# Altium PCB EMG-Arm-ELEC-V1.0.PcbDoc (part 4 of 5)
Units mil, origin at the board's own origin, x right, y up, seen from the top; angles counter-clockwise.
Board outline 8303.83 x 7532.25 mil, 2 copper layers (Top Layer, Bottom Layer), stack 3.556 mil thick; 303 components, 183 nets, 804 pads, 233 vias.
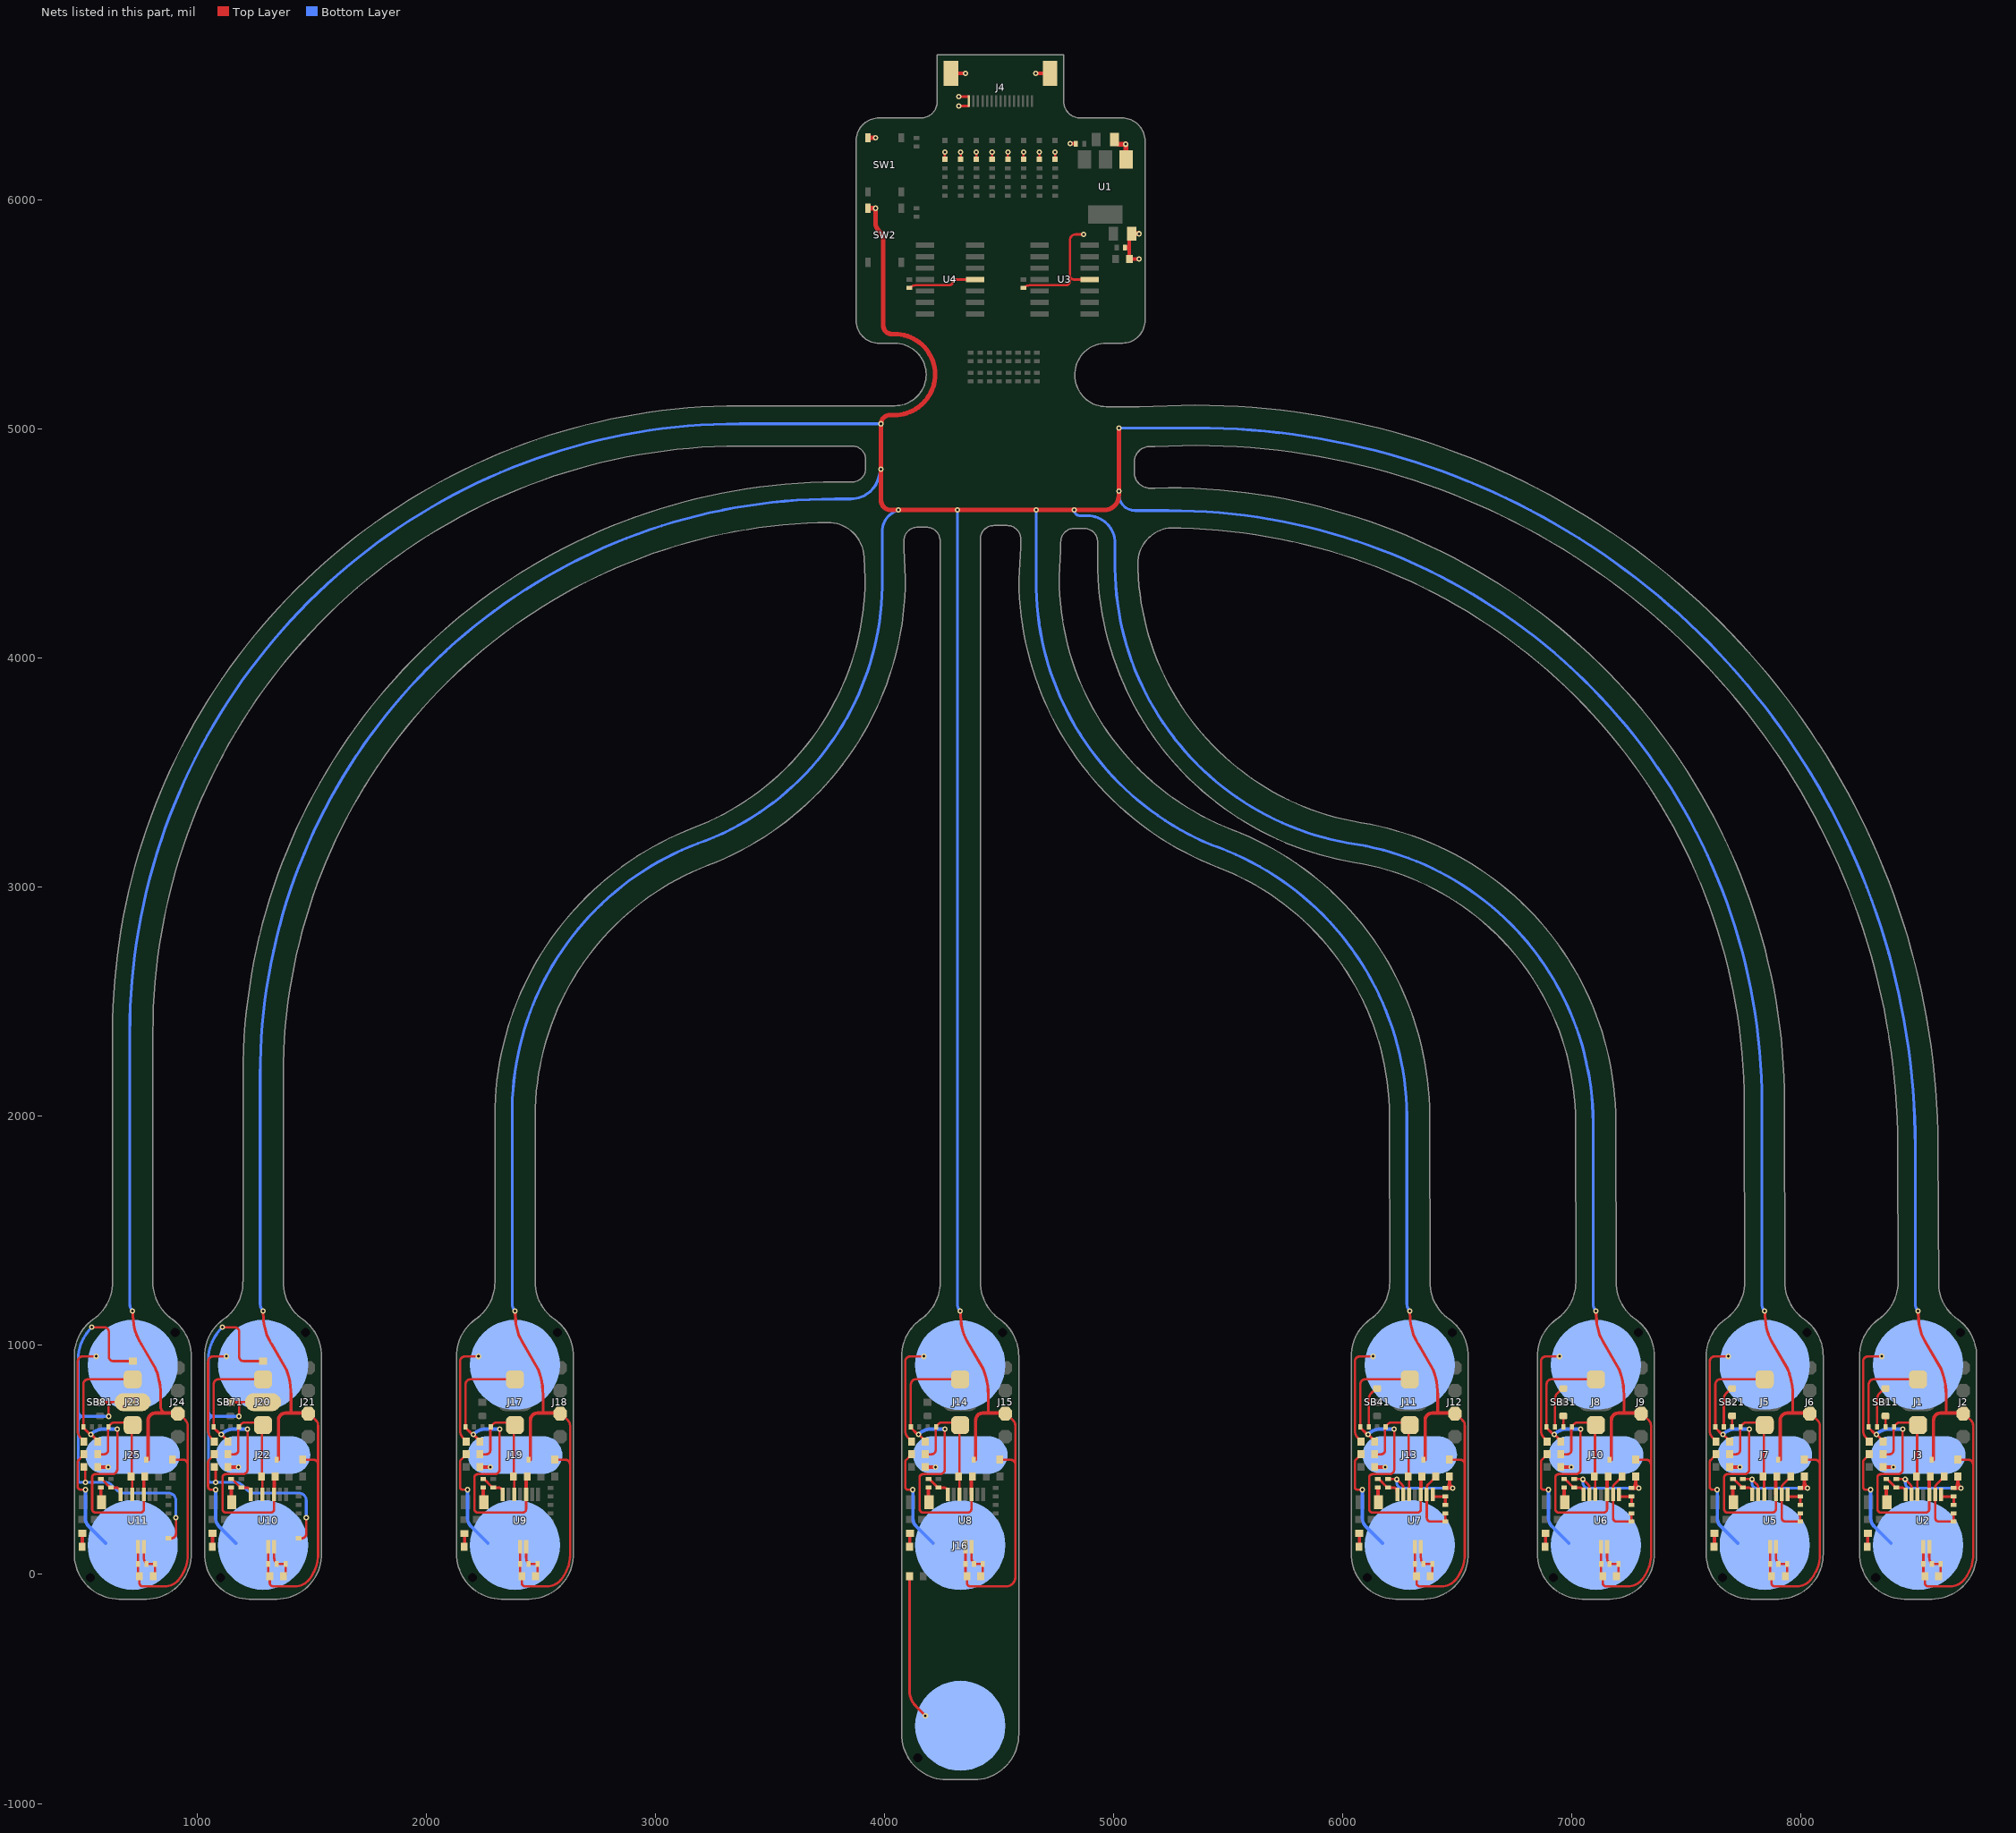
[diagram p3: the nets of this part, all layers, seen from the top]

## Via types
v1: diameter 23.62, hole 11.81, Top Layer to Bottom Layer, tented both sides, 233 vias

## Nets (pads, with @x,y where several pads share a name; then routed paths per layer and width w, separated by ;. In a path a pad name is that pad's centre, name@x,y a point inside that pad or via, vN(x,y) a via of type N, cw(c..) or ccw(c..) an arc to the next point about the centre after c; other vN are vias at no path point) (continued)
DRL_7: J20.2 R100.2 R120.1 SB71.2 SB73.2 | length 2170.6
  Top Layer w10: v1(1081.63,401.46) SB73.2@1081.63,467.64 ; v1(1110.38,1079.6) 1164.03,1079.6 cw(c1164.03,1059) 1184.63,1059 1184.63,950 ccw(c1203.1,950) 1203.1,931.53 R120.1@1288.59,931.53 ; SB71.2@1146.15,751.97 1183.15,751.97 ; 1168.79,751.97 cw(c1168.79,736.97) 1183.79,736.97 cw(c1198.79,736.97) 1198.79,751.97 ; v1(1183.79,690.31) 1183.79,750.42 ccw(c1181.6,750.42) 1183.15,751.97 ; J20.2@1288.59,751.97 1183.15,751.97 ; R100.2@1443.48,158 1457.45,158 ccw(c1457.45,177.7) 1477.15,177.7 v1(1477.15,247.87)
  Bottom Layer w12: 1053.1,690.31 1073.1,690.31 ; v1(1110.38,1079.6) ccw(c1259.02,930.86) 1050.4,957.2 1050.4,713.02 ; v1(1183.79,690.31) 1073.1,690.31 ; v1(1477.15,247.87) 1477.15,323.48 ccw(c1445.63,323.48) 1445.63,355 1250.84,355 cw(c1250.84,400.14) 1218.84,368.3 1195.57,391.57 ccw(c1171.46,367.46) 1170.09,401.53 1168.39,401.46 v1(1081.63,401.46) 1060.63,401.46 cw(c1060.63,411.7) 1050.4,411.7 1050.4,667.61 ; 1050.4,667.61 cw(c1073.1,667.61) 1073.1,690.31 ; 1050.4,667.61 1050.4,713.02 ; 1050.4,713.02 ccw(c1073.1,713.02) 1073.1,690.31
DRL_8: J23.2 R113.2 R121.1 SB81.2 SB83.2 | length 2170.6
  Top Layer w10: v1(512.65,401.46) SB83.2@512.65,467.64 ; v1(541.4,1079.6) 595.05,1079.6 cw(c595.05,1059) 615.65,1059 615.65,950 ccw(c634.13,950) 634.13,931.53 R121.1@719.62,931.53 ; SB81.2@577.17,751.97 614.17,751.97 ; 599.81,751.97 cw(c599.81,736.97) 614.81,736.97 cw(c629.81,736.97) 629.81,751.97 ; v1(614.81,690.31) 614.81,750.42 ccw(c612.62,750.42) 614.17,751.97 ; J23.2@719.62,751.97 614.17,751.97 ; R113.2@874.5,158 888.48,158 ccw(c888.48,177.7) 908.18,177.7 v1(908.18,247.87)
  Bottom Layer w12: 484.13,690.31 504.13,690.31 ; v1(541.4,1079.6) ccw(c690.04,930.86) 481.42,957.2 481.42,713.02 ; v1(614.81,690.31) 504.13,690.31 ; v1(908.18,247.87) 908.18,323.48 ccw(c876.65,323.48) 876.65,355 681.87,355 cw(c681.86,400.14) 649.86,368.3 626.6,391.57 ccw(c602.48,367.46) 601.11,401.53 599.42,401.46 v1(512.65,401.46) 491.65,401.46 cw(c491.65,411.7) 481.42,411.7 481.42,667.61 ; 481.42,667.61 cw(c504.13,667.61) 504.13,690.31 ; 481.42,667.61 481.42,713.02 ; 481.42,713.02 ccw(c504.13,713.02) 504.13,690.31
GND: C1.2 C2.1 C3.2 C4.1 C5.1 C6.1 C12.1 C13.2 C14.2 C15.2 C16.1 C17.1 C23.1 C24.1 C25.1 C31.1 C32.1 C33.1 C39.1 C40.1 C41.1 C47.1 C48.1 C49.1 C55.1 C56.1 C57.1 C63.1 C64.1 C65.1 C71.1 D1.1 D2.1 D3.1 D4.1 D5.1 D6.1 D7.1 D8.1 J2.2 J4.1 J4.MP1 J4.MP2 J6.2 J9.2 J12.2 J15.2 J18.2 J21.2 J24.2 R13.1 R36.1 R49.2 R62.2 R75.1 R88.1 R101.1 R114.1 SW1.2 SW2.2 U1.1 U2.11 U3.11 U4.11 U5.11 U6.11 U7.11 U8.11 U9.11 U10.11 U11.11 | length 59937
  Top Layer w10: U11.11@742.65,121 R114.1@742.65,46 742.65,3.49 ccw(c749.14,3.49) 749.14,-3 C71.1@749.14,-8 749.14,-37.36 ccw(c763.69,-37.36) 763.69,-51.91 858.77,-51.91 ccw(c858.81,28.34) 915.04,-28.92 ccw(c878.96,7.54) 920,-23.23 932.07,-7.13 943.76,13.65 951.88,33.9 957.4,55.46 959.78,75.31 ccw(c949.85,76.49) 959.85,76.49 959.85,479.45 ; C65.1@893.09,501.23 938.15,501.23 cw(c938.08,479.45) 959.85,479.45 ; J24.2@916.65,707 950.15,673.51 950.21,673.45 cw(c926.92,650.16) 959.85,650.18 ; 959.85,650.11 959.85,479.45 ; U10.11@1311.63,121 R101.1@1311.63,46 1311.63,3.49 ccw(c1318.12,3.49) 1318.12,-3 C63.1@1318.12,-8 1318.12,-37.36 ccw(c1332.67,-37.36) 1332.67,-51.91 1427.75,-51.91 ccw(c1427.79,28.34) 1484.01,-28.92 ccw(c1447.94,7.54) 1488.98,-23.23 1501.05,-7.13 1512.73,13.65 1520.85,33.9 1526.37,55.46 1528.76,75.31 ccw(c1518.83,76.49) 1528.83,76.49 1528.83,479.45 ; C57.1@1462.06,501.23 1507.06,501.23 ; J21.2@1485.63,707 1519.12,673.51 1519.18,673.45 cw(c1495.89,650.16) 1528.83,650.18 ; 1507.1,501.23 cw(c1507.06,479.45) 1528.83,479.45 ; 1528.83,650.12 1528.83,479.45 ; U9.11@2411.41,121 R88.1@2411.41,46 2411.41,3.49 ccw(c2417.9,3.49) 2417.9,-3 C55.1@2417.9,-8 2417.9,-37.36 ccw(c2432.45,-37.36) 2432.45,-51.91 2527.53,-51.91 ccw(c2527.57,28.34) 2583.8,-28.92 ccw(c2547.72,7.54) 2588.76,-23.23 2600.83,-7.13 2612.52,13.65 2620.64,33.9 2626.16,55.46 2628.54,75.31 ccw(c2618.61,76.49) 2628.61,76.49 2628.61,479.45 ; C49.1@2561.85,501.23 2606.84,501.23 ; J18.2@2585.41,707 2618.91,673.51 2618.97,673.45 cw(c2595.68,650.16) 2628.61,650.18 ; 2606.89,501.23 cw(c2606.84,479.45) 2628.61,479.45 ; 2628.61,650.11 2628.61,479.45 ; C15.2@4108.98,5616.82 cw(c4137.28,5588.52) 4137.28,5628.54 4282.25,5628.54 ccw(c4282.25,5646.62) 4300.33,5646.62 v1(4300.33,5653.82) U4.11@4397,5653.82 ; D1.1@4264.84,6178.32 v1(4264.84,6211.12) ; D2.1@4333.58,6178.32 v1(4333.58,6211.12) ; U8.11@4354.9,121 R75.1@4354.9,46 4354.9,3.49 ccw(c4361.39,3.49) 4361.39,-3 C47.1@4361.39,-8 4361.39,-37.36 ccw(c4375.94,-37.36) 4375.94,-51.91 4457.97,-51.91 4532.25,-51.91 ccw(c4532.25,-12.06) 4572.1,-12.06 4572.1,479.45 ; D3.1@4402.32,6178.32 v1(4402.32,6211.12) ; D4.1@4471.06,6178.32 v1(4471.06,6211.12) ; C41.1@4505.33,501.23 4550.32,501.23 ; J15.2@4528.9,707 4562.39,673.51 4562.45,673.45 cw(c4539.16,650.16) 4572.1,650.18 ; D5.1@4539.8,6178.32 v1(4539.8,6211.12) ; 4550.37,501.23 cw(c4550.32,479.45) 4572.1,479.45 ; 4572.1,650.12 4572.1,479.45 ; C14.2@4607.02,5616.82 cw(c4635.32,5588.52) 4635.32,5628.54 4793.22,5628.54 ccw(c4793.22,5646.32) 4811,5646.32 4811,5670 ; D6.1@4608.54,6178.32 v1(4608.54,6211.12) ; D7.1@4677.28,6178.32 v1(4677.28,6211.12) ; D8.1@4746.02,6178.32 v1(4746.02,6211.12) ; v1(4871,5851) 4835.45,5851 ccw(c4835.45,5826.55) 4811,5826.55 4811,5670 ; U3.11@4896.02,5653.82 4827.18,5653.82 cw(c4827.18,5670) 4811,5670 ; U7.11@6317.06,121 R62.2@6317.06,46 6317.06,3.49 ccw(c6323.55,3.49) 6323.55,-3 C39.1@6323.55,-8 6323.55,-37.36 ccw(c6338.1,-37.36) 6338.1,-51.91 6433.18,-51.91 ccw(c6433.22,28.34) 6489.45,-28.92 ccw(c6453.37,7.54) 6494.41,-23.23 6506.48,-7.13 6518.16,13.65 6526.29,33.9 6531.8,55.46 6534.19,75.31 ccw(c6524.26,76.49) 6534.26,76.49 6534.26,479.45 ; C33.1@6467.49,501.23 6512.49,501.23 ; J12.2@6491.06,707 6524.56,673.51 6524.61,673.45 cw(c6501.33,650.16) 6534.26,650.18 ; 6512.54,501.23 cw(c6512.49,479.45) 6534.26,479.45 ; 6534.26,650.11 6534.26,479.45 ; U6.11@7129.78,120.99 R49.2@7129.78,45.99 7129.78,3.48 ccw(c7136.27,3.48) 7136.27,-3.01 C31.1@7136.27,-8.01 7136.27,-37.36 ccw(c7150.82,-37.36) 7150.82,-51.91 7245.89,-51.91 ccw(c7245.94,28.33) 7302.16,-28.93 ccw(c7266.08,7.54) 7307.12,-23.23 7319.19,-7.13 7330.88,13.64 7339,33.89 7344.52,55.45 7346.9,75.3 ccw(c7336.97,76.48) 7346.97,76.48 7346.97,479.45 ; C25.1@7280.21,501.22 7325.2,501.22 cw(c7325.2,479.45) 7346.97,479.45 ; J9.2@7303.78,706.99 7337.27,673.5 7337.33,673.44 cw(c7314.04,650.15) 7346.97,650.18 ; 7346.97,650.11 7346.97,479.45 ; U5.11@7866.53,121 R36.1@7866.53,46 7866.53,3.49 ccw(c7873.01,3.49) 7873.01,-3 C23.1@7873.01,-8 7873.01,-37.36 ccw(c7887.56,-37.36) 7887.56,-51.91 7982.64,-51.91 ccw(c7982.68,28.34) 8038.91,-28.92 ccw(c8002.83,7.54) 8043.87,-23.23 8055.94,-7.13 8067.63,13.65 8075.75,33.9 8081.27,55.46 8083.65,75.31 ccw(c8073.72,76.49) 8083.72,76.49 8083.72,479.45 ; C17.1@8016.96,501.23 8061.95,501.23 cw(c8061.95,479.45) 8083.72,479.45 ; J6.2@8040.53,707 8074.02,673.51 8074.08,673.45 cw(c8050.79,650.16) 8083.72,650.18 ; 8083.72,650.12 8083.72,479.45 ; U2.11@8536,121 R13.1@8536,46 8536,3.49 ccw(c8542.49,3.49) 8542.49,-3 C12.1@8542.49,-8 8542.49,-37.36 ccw(c8557.04,-37.36) 8557.04,-51.91 8652.12,-51.91 ccw(c8652.16,28.34) 8708.38,-28.92 ccw(c8672.3,7.54) 8713.35,-23.23 8725.42,-7.13 8737.1,13.65 8745.22,33.89 8750.74,55.46 8753.13,75.31 ccw(c8743.2,76.49) 8753.2,76.49 8753.2,479.45 ; C6.1@8686.43,501.22 8731.43,501.22 ; J2.2@8710,707 8743.49,673.51 8743.55,673.45 cw(c8720.26,650.16) 8753.2,650.18 ; 8731.47,501.22 cw(c8731.43,479.45) 8753.2,479.45 ; 8753.2,650.11 8753.2,479.45
  Top Layer w12: v1(719.11,1150.98) 722.34,1109.13 ccw(c944.53,1126.27) 756.35,1006.9 756.47,1006.71 820.48,896.78 cw(c532.52,783.74) 820.82,895.89 cw(c532.52,783.74) 841.87,783.69 841.87,731.53 ; 841.65,731.53 ccw(c868.74,731.53) 868.74,704.44 ; v1(1288.09,1150.98) 1291.32,1109.13 ccw(c1513.51,1126.27) 1325.32,1006.9 1325.44,1006.71 1389.45,896.78 cw(c1101.5,783.74) 1389.8,895.89 cw(c1101.5,783.74) 1410.84,783.69 1410.84,704.44 ; v1(2387.87,1150.98) 2391.1,1109.13 ccw(c2613.29,1126.27) 2425.11,1006.9 2425.23,1006.71 2489.24,896.78 cw(c2201.28,783.74) 2489.58,895.89 cw(c2201.28,783.74) 2510.63,783.69 2510.63,704.44 ; v1(4325.38,6411.84) J4.1@4368.17,6411.84 ; v1(4325.38,6452.78) J4.1@4368.17,6452.78 ; v1(4331.36,1150.98) 4334.59,1109.13 ccw(c4556.77,1126.27) 4368.59,1006.9 4368.71,1006.71 4432.72,896.78 cw(c4144.77,783.74) 4433.06,895.89 cw(c4144.77,783.74) 4454.11,783.7 4454.11,704.44 ; v1(6293.52,1150.98) 6296.75,1109.13 ccw(c6518.94,1126.27) 6330.76,1006.9 6330.88,1006.71 6394.88,896.78 cw(c6106.93,783.74) 6395.23,895.89 cw(c6106.93,783.74) 6416.27,783.69 6416.27,704.44 ; v1(7106.24,1150.97) 7109.46,1109.13 ccw(c7331.65,1126.26) 7143.47,1006.89 7143.59,1006.7 7207.6,896.77 cw(c6919.64,783.74) 7207.94,895.89 cw(c6919.64,783.74) 7228.99,783.69 7228.99,704.43 ; v1(7842.98,1150.98) 7846.21,1109.13 ccw(c8068.4,1126.27) 7880.22,1006.9 7880.34,1006.71 7944.35,896.78 cw(c7656.39,783.74) 7944.69,895.89 cw(c7656.39,783.74) 7965.74,783.7 7965.74,704.44 ; v1(8512.46,1150.98) 8515.69,1109.13 ccw(c8737.88,1126.27) 8549.69,1006.9 8549.81,1006.71 8613.82,896.78 cw(c8325.87,783.74) 8614.17,895.89 cw(c8325.87,783.74) 8635.21,783.69 8635.21,704.44
  Top Layer w15: C64.1@786.83,501.23 786.83,673.18 cw(c818.09,673.18) 818.09,704.44 910.22,704.44 cw(c910.22,703.22) J24.2@911.44,703.22 ; C56.1@1355.8,501.23 1355.8,673.18 cw(c1387.06,673.18) 1387.06,704.44 1479.19,704.44 cw(c1479.19,703.22) J21.2@1480.41,703.22 ; C48.1@2455.59,501.23 2455.59,673.18 cw(c2486.85,673.18) 2486.85,704.44 2578.97,704.44 cw(c2578.97,703.22) J18.2@2580.19,703.22 ; J4.MP2@4303.14,6554.36 v1(4354.08,6554.36) ; C40.1@4399.07,501.23 4399.07,673.18 cw(c4430.33,673.18) 4430.33,704.44 4522.46,704.44 cw(c4522.46,703.22) J15.2@4523.68,703.22 ; v1(4661.64,6554.36) J4.MP1@4712.58,6554.36 ; v1(4811,6247.05) C4.1@4836.36,6247.05 ; C2.1@5051.75,5793.82 5070.26,5793.82 ; C1.2@5080.25,5853.82 ccw(c5080.25,5843.83) 5070.26,5843.83 5070.26,5793.82 ; v1(5113,5743.82) C13.2@5070.26,5743.82 5070.26,5793.82 ; C32.1@6361.24,501.23 6361.24,673.18 cw(c6392.49,673.18) 6392.49,704.44 6484.62,704.44 cw(c6484.62,703.22) J12.2@6485.84,703.22 ; C24.1@7173.95,501.22 7173.95,673.18 cw(c7205.21,673.18) 7205.21,704.43 7297.34,704.43 cw(c7297.34,703.21) J9.2@7298.56,703.21 ; C16.1@7910.7,501.23 7910.7,673.18 cw(c7941.96,673.18) 7941.96,704.44 8034.09,704.44 cw(c8034.09,703.22) J6.2@8035.31,703.22 ; C5.1@8580.17,501.22 8580.17,673.18 cw(c8611.43,673.18) 8611.43,704.44 8703.56,704.44 cw(c8703.56,703.22) J2.2@8704.78,703.22
  Top Layer w20: SW2.2@3928.99,5965.18 v1(3961.83,5965.18) 3961.83,5900.79 ccw(c4006.79,5900.79) 3975,5869 cw(c3924.3,5818.3) 3996,5818.3 3996,5452.35 ; SW1.2@3928.99,6272.18 v1(3961.83,6272.18) ; 4222.33,5240.66 cw(c4043.47,5240.66) 4043.47,5061.8 4024.32,5061.8 ccw(c4024.32,5023.89) 3999.29,5052.37 ccw(c4024.32,5023.89) v1(3986.4,5023.89) v1(3986.4,4825.32) 3986.4,4689.17 ccw(c4027.93,4689.17) 4027.93,4647.64 v1(4061.54,4647.64) v1(4319.65,4647.64) v1(4663.35,4647.64) v1(4829.77,4647.64) 4960.64,4647.64 ccw(c4960.64,4711) 5024,4711 v1(5024,4729.14) v1(5024,5005.89) ; 4222.33,5240.79 ccw(c4044.84,5238.51) 4044.84,5416.01 4032.34,5416.01 cw(c4032.34,5452.35) 3996,5452.28 ; C3.2@5005.45,6264.88 ccw(c5025.78,6264.88) 5025.78,6244.55 v1(5054.8,6244.55) 5054.8,6179.34 ccw(c5056,6179.34) U1.1@5056,6178.15 ; C1.2@5080.25,5853.82 v1(5113,5853.82) ; 3996,5452.28 cw(c4032.34,5452.35) 3996,5452.35 ; 3996,5452.28 3996,5452.35
  Bottom Layer w12: 707.11,1179.95 ccw(c748.09,1179.95) v1(719.11,1150.98) cw(c748.46,1180.32) 706.96,1180.32 706.96,2365.89 cw(c3366.86,2363.99) 3368.75,5023.89 v1(3986.4,5023.89) ; 1276.09,1179.95 ccw(c1317.06,1179.95) v1(1288.09,1150.98) cw(c1317.44,1180.32) 1275.94,1180.32 1275.94,2180.89 cw(c3787.35,2184.48) 3783.75,4695.89 3855.2,4695.89 3855.27,4695.89 ccw(c3855.27,4820.03) 3974.22,4784.52 v1(3986.4,4825.32) ; 2375.87,1179.95 ccw(c2416.84,1179.95) v1(2387.87,1150.98) cw(c2416.7,1179.8) 2375.94,1179.8 2375.94,2001.91 cw(c3630.82,2017.98) 3223.16,3204.91 ccw(c2780.54,4331.66) 3990.99,4348.48 3990.99,4552.38 3990.99,4552.45 cw(c4089.35,4552.45) 4050.02,4642.61 v1(4061.54,4647.64) ; 4319.29,1180.1 ccw(c4360.48,1180.1) v1(4331.36,1150.98) ; 4319.36,1179.95 ccw(c4360.33,1179.95) v1(4331.36,1150.98) ; 4319.65,1234.4 4319.65,1179.23 ; v1(4319.65,4647.64) 4319.65,1179.23 ; v1(4663.35,4647.64) 4663.35,4341.83 ccw(c5903.94,4331.13) 5426.51,3186.03 cw(c5017.58,1990.05) 6281.46,2004.87 6281.46,1180.1 ccw(c6322.65,1180.1) v1(6293.52,1150.98) cw(c6322.49,1179.95) 6281.52,1179.95 ; v1(4829.77,4647.64) ccw(c4854.58,4647.64) 4854.58,4622.83 4887.1,4622.83 cw(c4887.1,4502.35) 5007.59,4502.35 5007.59,4430.5 ccw(c6238.93,4406.58) 6027.04,3193.37 cw(c5856.77,1967.36) 7094.53,1971.47 7094.53,1185.79 7094.53,1179.23 ccw(c7134.49,1179.23) v1(7106.24,1150.97) cw(c7135.21,1179.94) 7094.24,1179.94 ; v1(5024,4729.14) 5024,4716.82 ccw(c5095.93,4716.82) 5095.93,4644.89 5240.76,4644.89 cw(c5243.36,2057.28) 7830.96,2059.89 7830.96,1180.01 ccw(c7872.02,1180.01) v1(7842.98,1150.98) cw(c7871.96,1179.95) 7830.98,1179.95 ; v1(5024,5005.89) 5359.75,5005.89 cw(c5362.11,1867.53) 8500.46,1869.89 8500.46,1179.95 ccw(c8541.43,1179.95) v1(8512.46,1150.98) ; 4319.65,1179.23 ccw(c4359.62,1179.23) v1(4331.36,1150.98)
IN+: C7.2 J1.1 R4.2 SB14.2 U2.5 | length 573.3
  Top Layer w10: SB14.2@8360,525 8387.95,525 ccw(c8387.95,542.5) 8405.45,542.5 8405.45,642.23 R4.2@8407.52,644.29 8407.52,647.79 8411.52,651.79 8412.69,651.79 8418.48,657.59 ; 8418.5,657.61 cw(c8432.48,643.59) 8432.48,663.39 8501.54,663.39 J1.1@8512.96,651.97 J1.1@8505.29,644.29 ; C7.2@8508.77,424 J1.1@8508.77,641.6 ; U2.5@8510.41,349.35 C7.2@8510.41,416.82
IN+2: C18.2 J5.1 R27.2 SB24.2 U5.5 | length 573.3
  Top Layer w10: SB24.2@7690.53,525 7718.47,525 ccw(c7718.47,542.5) 7735.97,542.5 7735.97,642.23 R27.2@7738.04,644.3 7738.04,647.8 7742.04,651.8 7743.21,651.8 7749.01,657.59 cw(c7763.01,643.6) 7763.01,663.39 7832.07,663.39 J5.1@7843.49,651.97 J5.1@7835.81,644.3 ; C18.2@7839.3,424 J5.1@7839.3,641.6 ; U5.5@7840.93,349.35 C18.2@7840.93,416.82
IN+3: C26.2 J8.1 R40.2 SB34.2 U6.5 | length 573.3
  Top Layer w10: SB34.2@6953.78,524.99 6981.73,524.99 ccw(c6981.73,542.49) 6999.23,542.49 6999.23,642.22 R40.2@7001.29,644.29 7001.29,647.79 7005.29,651.79 7006.46,651.79 7012.26,657.59 cw(c7026.26,643.59) 7026.26,663.39 7095.32,663.39 J8.1@7106.74,651.96 J8.1@7099.07,644.29 ; C26.2@7102.55,423.99 J8.1@7102.55,641.6 ; U6.5@7104.19,349.34 C26.2@7104.19,416.81
IN+4: C34.2 J11.1 R53.2 SB44.2 U7.5 | length 573.3
  Top Layer w10: SB44.2@6141.06,525 6169.01,525 ccw(c6169.01,542.5) 6186.51,542.5 6186.51,642.23 R53.2@6188.58,644.29 6188.58,647.79 6192.58,651.79 6193.75,651.79 6199.55,657.59 ; 6199.56,657.61 cw(c6213.55,643.59) 6213.55,663.39 6282.6,663.39 J11.1@6294.03,651.97 J11.1@6286.35,644.29 ; C34.2@6289.83,424 J11.1@6289.83,641.6 ; U7.5@6291.47,349.35 C34.2@6291.47,416.82
IN+5: C42.2 J14.1 R66.2 SB54.2 U8.5 | length 573.3
  Top Layer w10: SB54.2@4178.9,525 4206.85,525 ccw(c4206.85,542.5) 4224.35,542.5 4224.35,642.23 R66.2@4226.42,644.3 4226.42,647.8 4230.42,651.8 4231.58,651.8 4237.38,657.59 cw(c4251.38,643.6) 4251.38,663.39 4320.44,663.39 J14.1@4331.86,651.97 J14.1@4324.19,644.3 ; C42.2@4327.67,424 J14.1@4327.67,641.6 ; U8.5@4329.31,349.35 C42.2@4329.31,416.82
IN+6: C50.2 J17.1 R79.2 SB64.2 U9.5 | length 573.3
  Top Layer w10: SB64.2@2235.41,525 2263.36,525 ccw(c2263.36,542.5) 2280.86,542.5 2280.86,642.23 R79.2@2282.93,644.29 2282.93,647.79 2286.93,651.79 2288.1,651.79 2293.9,657.59 ; 2293.92,657.61 cw(c2307.9,643.59) 2307.9,663.39 2376.96,663.39 J17.1@2388.38,651.97 J17.1@2380.7,644.29 ; C50.2@2384.19,424 J17.1@2384.19,641.6 ; U9.5@2385.82,349.35 C50.2@2385.82,416.82
IN+7: C58.2 J20.1 R92.2 SB74.2 U10.5 | length 573.3
  Top Layer w10: SB74.2@1135.63,525 1163.58,525 ccw(c1163.58,542.5) 1181.08,542.5 1181.08,642.23 R92.2@1183.15,644.29 1183.15,647.79 1187.15,651.79 1188.32,651.79 1194.11,657.59 cw(c1208.11,643.59) 1208.11,663.39 1277.17,663.39 J20.1@1288.59,651.97 J20.1@1280.92,644.29 ; C58.2@1284.4,424 J20.1@1284.4,641.6 ; U10.5@1286.04,349.35 C58.2@1286.04,416.82
IN+8: C66.2 J23.1 R105.2 SB84.2 U11.5 | length 573.3
  Top Layer w10: SB84.2@566.65,525 594.6,525 ccw(c594.6,542.5) 612.1,542.5 612.1,642.23 R105.2@614.17,644.29 614.17,647.79 618.17,651.79 619.34,651.79 625.14,657.59 ; 625.16,657.61 cw(c639.14,643.59) 639.14,663.39 708.2,663.39 J23.1@719.62,651.97 J23.1@711.94,644.29 ; C66.2@715.43,424 J23.1@715.43,641.6 ; U11.5@717.06,349.35 C66.2@717.06,416.82
IN-: C7.1 J1.3 R3.1 SB15.2 U2.3 | length 1443.9
  Top Layer w10: R3.1@8297.56,640.79 R3.1@8297.56,644.29 8297.56,830.35 cw(c8319.18,830.35) 8319.18,851.97 J1.3@8512.96,851.97 ; v1@8324.05,614.3 8327.92,614.3 v1(8330.52,611.7) v1@8330.8,611.7 ; v1(8445.57,634.78) 8445.57,458.7 cw(c8424.5,458.7) 8424.5,437.63 8349.63,437.63 ccw(c8349.63,424) 8336,424 8336,284.86 ccw(c8350.86,284.86) 8350.86,270 8545.9,270 ccw(c8545.9,285.69) 8561.59,285.69 U2.3@8561.59,349.35
  Top Layer w12: R3.1@8297.56,640.79 v1@8324.05,614.3 ; v1@8330.8,611.7 SB15.2@8360,582.5
  Top Layer w15: U2.3@8561.59,349.35 C7.1@8561.59,416.82
  Bottom Layer w15: v1(8330.52,611.7) cw(c8386.26,555.96) 8386.26,634.78 v1(8445.57,634.78)
IN-2: C18.1 J5.3 R26.1 SB25.2 U5.3 | length 1443.9
  Top Layer w10: R26.1@7628.09,640.8 R26.1@7628.09,644.3 7628.09,830.35 cw(c7649.71,830.35) 7649.71,851.97 J5.3@7843.49,851.97 ; v1@7654.58,614.3 7658.44,614.3 v1(7661.05,611.7) v1@7661.33,611.7 ; v1(7776.1,634.79) 7776.1,458.7 cw(c7755.02,458.7) 7755.02,437.63 7680.16,437.63 ccw(c7680.16,424) 7666.53,424 7666.53,284.86 ccw(c7681.38,284.86) 7681.38,270 7876.43,270 ccw(c7876.43,285.69) 7892.12,285.69 U5.3@7892.12,349.35
  Top Layer w12: R26.1@7628.09,640.8 v1@7654.58,614.3 ; v1@7661.33,611.7 SB25.2@7690.53,582.5
  Top Layer w15: U5.3@7892.12,349.35 C18.1@7892.12,416.82
  Bottom Layer w15: v1@7661.08,611.73 cw(c7716.79,555.96) 7716.79,634.79 v1(7776.1,634.79)
IN-3: C26.1 J8.3 R39.1 SB35.2 U6.3 | length 1443.9
  Top Layer w10: R39.1@6891.34,640.79 R39.1@6891.34,644.29 6891.34,830.34 cw(c6912.96,830.34) 6912.96,851.96 J8.3@7106.74,851.96 ; v1@6917.83,614.3 6921.69,614.3 v1(6924.3,611.69) v1@6924.58,611.69 ; v1(7039.35,634.78) 7039.35,458.69 cw(c7018.28,458.69) 7018.28,437.62 6943.41,437.62 ccw(c6943.41,423.99) 6929.78,423.99 6929.78,284.85 ccw(c6944.63,284.85) 6944.63,269.99 7139.68,269.99 ccw(c7139.68,285.68) 7155.37,285.68 U6.3@7155.37,349.34
  Top Layer w12: R39.1@6891.34,640.79 v1@6917.83,614.3 ; v1@6924.58,611.69 SB35.2@6953.78,582.49
  Top Layer w15: U6.3@7155.37,349.34 C26.1@7155.37,416.81
  Bottom Layer w15: v1(6924.3,611.69) cw(c6980.04,555.95) 6980.04,634.78 v1(7039.35,634.78)
IN-4: C34.1 J11.3 R52.1 SB45.2 U7.3 | length 1443.9
  Top Layer w10: R52.1@6078.62,640.79 R52.1@6078.62,644.29 6078.62,830.35 cw(c6100.24,830.35) 6100.24,851.97 J11.3@6294.03,851.97 ; v1@6105.12,614.3 6108.98,614.3 v1(6111.59,611.7) v1@6111.87,611.7 ; v1(6226.64,634.79) 6226.64,458.7 cw(c6205.56,458.7) 6205.56,437.63 6130.69,437.63 ccw(c6130.69,424) 6117.06,424 6117.06,284.86 ccw(c6131.92,284.86) 6131.92,270 6326.97,270 ccw(c6326.97,285.69) 6342.65,285.69 U7.3@6342.65,349.35
  Top Layer w12: R52.1@6078.62,640.79 v1@6105.12,614.3 ; v1@6111.87,611.7 SB45.2@6141.06,582.5
  Top Layer w15: U7.3@6342.65,349.35 C34.1@6342.65,416.82
  Bottom Layer w15: v1(6111.59,611.7) cw(c6167.33,555.96) 6167.33,634.79 v1(6226.64,634.79)
IN-5: C42.1 J14.3 R65.1 SB55.2 U8.3 | length 1443.9
  Top Layer w10: R65.1@4116.46,640.8 R65.1@4116.46,644.3 4116.46,830.35 cw(c4138.08,830.35) 4138.08,851.97 J14.3@4331.86,851.97 ; v1@4142.95,614.3 4146.82,614.3 v1(4149.42,611.7) v1@4149.7,611.7 ; v1(4264.47,634.79) 4264.47,458.7 cw(c4243.4,458.7) 4243.4,437.63 4168.53,437.63 ccw(c4168.53,424) 4154.9,424 4154.9,284.86 ccw(c4169.76,284.86) 4169.76,270 4364.8,270 ccw(c4364.8,285.69) 4380.49,285.69 U8.3@4380.49,349.35
  Top Layer w12: R65.1@4116.46,640.8 v1@4142.95,614.3 ; v1@4149.7,611.7 SB55.2@4178.9,582.5
  Top Layer w15: U8.3@4380.49,349.35 C42.1@4380.49,416.82
  Bottom Layer w15: v1(4149.42,611.7) cw(c4205.16,555.96) 4205.16,634.79 v1(4264.47,634.79)
IN-6: C50.1 J17.3 R78.1 SB65.2 U9.3 | length 1443.9
  Top Layer w10: R78.1@2172.98,640.79 R78.1@2172.98,644.29 2172.98,830.35 cw(c2194.59,830.35) 2194.59,851.97 J17.3@2388.38,851.97 ; v1@2199.47,614.3 2203.33,614.3 v1(2205.94,611.7) v1@2206.22,611.7 ; v1(2320.99,634.79) 2320.99,458.7 cw(c2299.91,458.7) 2299.91,437.63 2225.04,437.63 ccw(c2225.04,424) 2211.41,424 2211.41,284.86 ccw(c2226.27,284.86) 2226.27,270 2421.32,270 ccw(c2421.32,285.69) 2437.01,285.69 U9.3@2437.01,349.35
  Top Layer w12: R78.1@2172.98,640.79 v1@2199.47,614.3 ; v1@2206.22,611.7 SB65.2@2235.41,582.5
  Top Layer w15: U9.3@2437.01,349.35 C50.1@2437.01,416.82
  Bottom Layer w15: v1(2205.94,611.7) cw(c2261.68,555.96) 2261.68,634.79 v1(2320.99,634.79)
IN-7: C58.1 J20.3 R91.1 SB75.2 U10.3 | length 1443.9
  Top Layer w10: R91.1@1073.19,640.79 R91.1@1073.19,644.29 1073.19,830.35 cw(c1094.81,830.35) 1094.81,851.97 J20.3@1288.59,851.97 ; v1@1099.68,614.3 1103.55,614.3 v1(1106.15,611.7) v1@1106.43,611.7 ; v1(1221.2,634.79) 1221.2,458.7 cw(c1200.13,458.7) 1200.13,437.63 1125.26,437.63 ccw(c1125.26,424) 1111.63,424 1111.63,284.86 ccw(c1126.49,284.86) 1126.49,270 1321.53,270 ccw(c1321.53,285.69) 1337.22,285.69 U10.3@1337.22,349.35
  Top Layer w12: R91.1@1073.19,640.79 v1@1099.68,614.3 ; v1@1106.43,611.7 SB75.2@1135.63,582.5
  Top Layer w15: U10.3@1337.22,349.35 C58.1@1337.22,416.82
  Bottom Layer w15: v1@1106.19,611.73 cw(c1161.89,555.96) 1161.89,634.79 v1(1221.2,634.79)
IN-8: C66.1 J23.3 R104.1 SB85.2 U11.3 | length 1443.9
  Top Layer w10: R104.1@504.22,640.79 R104.1@504.22,644.29 504.22,830.35 cw(c525.83,830.35) 525.83,851.97 J23.3@719.62,851.97 ; v1@530.71,614.3 534.57,614.3 v1(537.18,611.7) v1@537.46,611.7 ; v1(652.23,634.79) 652.23,458.7 cw(c631.15,458.7) 631.15,437.63 556.28,437.63 ccw(c556.28,424) 542.65,424 542.65,284.86 ccw(c557.51,284.86) 557.51,270 752.56,270 ccw(c752.56,285.69) 768.25,285.69 U11.3@768.25,349.35
  Top Layer w12: R104.1@504.22,640.79 v1@530.71,614.3 ; v1@537.46,611.7 SB85.2@566.65,582.5
  Top Layer w15: U11.3@768.25,349.35 C66.1@768.25,416.82
  Bottom Layer w15: v1(537.18,611.7) cw(c592.92,555.96) 592.92,634.79 v1(652.23,634.79)
inaOUT: R5.1 R10.1 U2.7 | length 120.9
  Top Layer w12: R10.1@8374.13,416.63 8380.63,413.63 8411.45,382.63 R5.1@8417.95,379.63 8424.45,379.63 8438.84,379.63 cw(c8438.84,357.78) 8456.37,370.82 U2.7@8459.23,349.35
inaOUT_2: R28.1 R33.1 U5.7 | length 120.9
  Top Layer w12: R33.1@7704.65,416.63 7711.15,413.63 7741.97,382.63 R28.1@7748.47,379.63 7754.97,379.63 7769.37,379.63 cw(c7769.37,357.78) 7786.9,370.82 U5.7@7789.75,349.35
inaOUT_3: R41.2 R46.2 U6.7 | length 120.9
  Top Layer w12: R46.2@6967.9,416.62 6974.4,413.62 7005.23,382.62 R41.2@7011.73,379.62 7018.23,379.62 7032.62,379.62 cw(c7032.62,357.77) 7050.15,370.82 U6.7@7053,349.34
inaOUT_4: R54.1 R59.1 U7.7 | length 120.9
  Top Layer w12: R59.1@6155.19,416.63 6161.69,413.63 6192.51,382.63 R54.1@6199.01,379.63 6205.51,379.63 6219.91,379.63 cw(c6219.9,357.78) 6237.43,370.82 U7.7@6240.29,349.35
inaOUT_5: R67.1 R72.1 U8.7 | length 120.9
  Top Layer w12: R72.1@4193.03,416.63 4199.53,413.63 4230.35,382.63 R67.1@4236.85,379.63 4243.35,379.63 4257.74,379.63 cw(c4257.74,357.78) 4275.27,370.82 U8.7@4278.13,349.35
inaOUT_6: R80.1 R85.1 U9.7 | length 120.9
  Top Layer w12: R85.1@2249.54,416.63 2256.04,413.63 2286.86,382.63 R80.1@2293.36,379.63 2299.86,379.63 2314.26,379.63 cw(c2314.26,357.78) 2331.78,370.82 U9.7@2334.64,349.35
inaOUT_7: R93.1 R98.1 U10.7 | length 120.9
  Top Layer w12: R98.1@1149.76,416.63 1156.26,413.63 1187.08,382.63 R93.1@1193.58,379.63 1200.08,379.63 1214.47,379.63 cw(c1214.47,357.78) 1232,370.82 U10.7@1234.86,349.35
inaOUT_8: R106.1 R111.1 U11.7 | length 120.9
  Top Layer w12: R111.1@580.78,416.63 587.28,413.63 618.1,382.63 R106.1@624.6,379.63 631.1,379.63 645.5,379.63 cw(c645.5,357.78) 663.03,370.82 U11.7@665.88,349.35
NetC8_2: C8.2 SB12.1 | length 59.7
  Top Layer w15: SB12.1@8291.55,121 ccw(c8291.55,122.49) 8293.04,122.49 C8.2@8293.04,179.87
NetC11_1: C11.1 R10.2 | length 63.1
  Top Layer w15: R10.2@8374.13,377.18 8374.13,317.71 C11.1@8376.71,315.12
NetC12_2: C12.2 R11.1 R13.2 U2.12 | length 170.1
  Top Layer w10: U2.12@8561.59,121 8561.59,74.08 ccw(c8601.08,74.08) 8565.46,57.04 ccw(c8601.08,74.08) 8573,46.32 ccw(c8601.08,74.08) 8573.16,46.16 8605.92,46.16 R11.1@8606.07,46.32 ; C12.2@8602.49,-8 8611.07,0.58 R11.1@8611.07,46.32 ; C12.2@8602.49,2.25 C12.2@8603.83,2.25
NetC19_2: C19.2 SB22.1 | length 59.7
  Top Layer w15: SB22.1@7622.07,121 ccw(c7622.07,122.49) 7623.56,122.49 C19.2@7623.56,179.88
NetC22_1: C22.1 R33.2 | length 63.1
  Top Layer w15: R33.2@7704.65,377.18 7704.65,317.71 C22.1@7707.24,315.12
NetC23_2: C23.2 R34.1 R36.2 U5.12 | length 170.1
  Top Layer w10: U5.12@7892.12,121 7892.12,74.09 ccw(c7931.61,74.09) 7895.98,57.05 ccw(c7931.61,74.09) 7903.53,46.32 ccw(c7931.61,74.09) 7903.68,46.16 7936.44,46.16 R34.1@7936.6,46.32 ; C23.2@7933.01,-8 7941.6,0.59 R34.1@7941.6,46.32 ; C23.2@7933.01,2.26 C23.2@7934.35,2.26
NetC27_2: C27.2 SB32.1 | length 59.7
  Top Layer w15: SB32.1@6885.32,121 ccw(c6885.32,122.48) 6886.81,122.48 C27.2@6886.81,179.87
NetC30_1: C30.1 R46.1 | length 63.1
  Top Layer w15: R46.1@6967.9,377.17 6967.9,317.7 C30.1@6970.49,315.12
NetC31_2: C31.2 R47.2 R49.1 U6.12 | length 170.1
  Top Layer w10: U6.12@7155.37,120.99 7155.37,74.08 ccw(c7194.86,74.08) 7159.23,57.04 ccw(c7194.86,74.08) 7166.78,46.31 ccw(c7194.86,74.08) 7166.93,46.15 7199.69,46.15 R47.2@7199.85,46.31 ; C31.2@7196.27,-8.01 7204.85,0.58 R47.2@7204.85,46.31 ; C31.2@7196.27,2.25 C31.2@7197.6,2.25
NetC35_2: C35.2 SB42.1 | length 59.7
  Top Layer w15: SB42.1@6072.61,121 ccw(c6072.61,122.49) 6074.1,122.49 C35.2@6074.1,179.88
NetC38_1: C38.1 R59.2 | length 63.1
  Top Layer w15: R59.2@6155.19,377.18 6155.19,317.71 C38.1@6157.78,315.12
NetC39_2: C39.2 R60.2 R62.1 U7.12 | length 170.1
  Top Layer w10: U7.12@6342.65,121 6342.65,74.08 ccw(c6382.15,74.08) 6346.52,57.04 ccw(c6382.15,74.08) 6354.06,46.32 ccw(c6382.15,74.08) 6354.22,46.16 6386.98,46.16 R60.2@6387.14,46.32 ; C39.2@6383.55,-8 6392.14,0.59 R60.2@6392.14,46.32 ; C39.2@6383.55,2.25 C39.2@6384.89,2.25
NetC43_2: C43.2 SB52.1 | length 59.7
  Top Layer w15: SB52.1@4110.45,121 ccw(c4110.45,122.49) 4111.94,122.49 C43.2@4111.94,179.88
NetC46_1: C46.1 R72.2 | length 63.1
  Top Layer w15: R72.2@4193.03,377.18 4193.03,317.71 C46.1@4195.61,315.12
NetC47_2: C47.2 R73.1 R75.2 U8.12 | length 170.1
  Top Layer w10: U8.12@4380.49,121 4380.49,74.09 ccw(c4419.98,74.09) 4384.35,57.05 ccw(c4419.98,74.09) 4391.9,46.32 ccw(c4419.98,74.09) 4392.06,46.16 4424.81,46.16 R73.1@4424.97,46.32 ; C47.2@4421.39,-8 4429.97,0.59 R73.1@4429.97,46.32 ; C47.2@4421.39,2.26 C47.2@4422.73,2.26
NetC51_2: C51.2 SB62.1 | length 59.7
  Top Layer w15: SB62.1@2166.96,121 ccw(c2166.96,122.49) 2168.45,122.49 C51.2@2168.45,179.88
NetC54_1: C54.1 R85.2 | length 63.1
  Top Layer w15: R85.2@2249.54,377.18 2249.54,317.71 C54.1@2252.13,315.12
NetC55_2: C55.2 R86.1 R88.2 U9.12 | length 170.1
  Top Layer w10: U9.12@2437.01,121 2437.01,74.08 ccw(c2476.5,74.08) 2440.87,57.04 ccw(c2476.5,74.08) 2448.41,46.32 ccw(c2476.5,74.08) 2448.57,46.16 2481.33,46.16 R86.1@2481.49,46.32 ; C55.2@2477.9,-8 2486.49,0.59 R86.1@2486.49,46.32 ; C55.2@2477.9,2.25 C55.2@2479.24,2.25
NetC59_2: C59.2 SB72.1 | length 59.7
  Top Layer w15: SB72.1@1067.18,121 ccw(c1067.18,122.49) 1068.67,122.49 C59.2@1068.67,179.88
NetC62_1: C62.1 R98.2 | length 63.1
  Top Layer w15: R98.2@1149.76,377.18 1149.76,317.71 C62.1@1152.35,315.12
NetC63_2: C63.2 R99.1 R101.2 U10.12 | length 170.1
  Top Layer w10: U10.12@1337.22,121 1337.22,74.09 ccw(c1376.72,74.09) 1341.09,57.05 ccw(c1376.72,74.09) 1348.63,46.32 ccw(c1376.72,74.09) 1348.79,46.16 1381.55,46.16 R99.1@1381.71,46.32 ; C63.2@1378.12,-8 1386.71,0.59 R99.1@1386.71,46.32 ; C63.2@1378.12,2.26 C63.2@1379.46,2.26
NetC67_2: C67.2 SB82.1 | length 59.7
  Top Layer w15: SB82.1@498.2,121 ccw(c498.2,122.49) 499.69,122.49 C67.2@499.69,179.88
NetC70_1: C70.1 R111.2 | length 63.1
  Top Layer w15: R111.2@580.78,377.18 580.78,317.71 C70.1@583.37,315.12
NetC71_2: C71.2 R112.1 R114.2 U11.12 | length 170.1
  Top Layer w10: U11.12@768.25,121 768.25,74.08 ccw(c807.74,74.08) 772.11,57.04 ccw(c807.74,74.08) 779.65,46.32 ccw(c807.74,74.08) 779.81,46.16 812.57,46.16 R112.1@812.73,46.32 ; C71.2@809.14,-8 817.73,0.59 R112.1@817.73,46.32 ; C71.2@809.14,2.25 C71.2@810.48,2.25
NetJ3_1: J3.1 SB15.1 | length 435.5
  Top Layer w10: SB15.1@8290,592.78 8285.34,597.43 cw(c8315.21,627.3) 8272.97,627.3 8272.97,929.34 cw(c8295.69,929.34) 8295.69,952.06 v1(8353.66,952.06)
NetJ3_2: J3.2 SB14.1 | length 450.7
  Top Layer w10: SB14.1@8293.81,517.21 8275.24,498.64 ccw(c8295.4,488.81) 8272.97,488.92 8272.97,382.69 ccw(c8285.66,382.69) 8285.66,370 v1(8306,370)
  Bottom Layer w15: v1@8306.27,370 8306.27,243.63 ccw(c8354.17,244.71) 8320.29,210.84 J3.2@8394.53,136.6
NetJ3_3: J3.3 SB13.1 | length 45
  Top Layer w15: SB13.1@8360.42,469.22 v1(8405.45,469.22)
NetJ7_1: J7.1 SB25.1 | length 435.5
  Top Layer w10: SB25.1@7620.53,592.78 7615.87,597.43 cw(c7645.74,627.3) 7603.5,627.3 7603.5,929.34 cw(c7626.21,929.34) 7626.21,952.06 v1(7684.19,952.06)
NetJ7_2: J7.2 SB24.1 | length 450.7
  Top Layer w10: SB24.1@7624.34,517.21 7605.77,498.65 ccw(c7625.92,488.81) 7603.5,488.92 7603.5,382.69 ccw(c7616.19,382.69) 7616.19,370 v1(7636.53,370)
  Bottom Layer w15: v1@7636.79,370 7636.79,243.63 ccw(c7684.69,244.71) 7650.81,210.84 J7.2@7725.05,136.6
NetJ7_3: J7.3 SB23.1 | length 45
  Top Layer w15: SB23.1@7690.94,469.23 v1(7735.97,469.23)
NetJ10_1: J10.1 SB35.1 | length 435.5
  Top Layer w10: SB35.1@6883.78,592.77 6879.12,597.43 cw(c6908.99,627.3) 6866.75,627.3 6866.75,929.33 cw(c6889.46,929.33) 6889.46,952.05 v1(6947.44,952.05)
NetJ10_2: J10.2 SB34.1 | length 450.7
  Top Layer w10: SB34.1@6887.59,517.21 6869.02,498.64 ccw(c6889.17,488.8) 6866.75,488.92 6866.75,382.68 ccw(c6879.44,382.68) 6879.44,369.99 v1(6899.78,369.99)
  Bottom Layer w15: v1@6900.05,369.99 6900.05,243.62 ccw(c6947.94,244.71) 6914.07,210.83 J10.2@6988.3,136.59
NetJ10_3: J10.3 SB33.1 | length 45
  Top Layer w15: SB33.1@6954.19,469.22 v1(6999.23,469.22)
NetJ13_1: J13.1 SB45.1 | length 435.5
  Top Layer w10: SB45.1@6071.06,592.78 6066.41,597.43 cw(c6096.28,627.3) 6054.03,627.3 6054.03,929.34 cw(c6076.75,929.34) 6076.75,952.06 v1(6134.73,952.06)
NetJ13_2: J13.2 SB44.1 | length 450.7
  Top Layer w10: SB44.1@6074.87,517.21 6056.31,498.65 ccw(c6076.46,488.81) 6054.03,488.92 6054.03,382.69 ccw(c6066.72,382.69) 6066.72,370 v1(6087.06,370)
  Bottom Layer w15: v1@6087.33,370 6087.33,243.63 ccw(c6135.23,244.71) 6101.35,210.84 J13.2@6175.59,136.6
NetJ13_3: J13.3 SB43.1 | length 45
  Top Layer w15: SB43.1@6141.48,469.23 v1(6186.51,469.23)
NetJ16_1: J16.1 SB55.1 | length 435.5
  Top Layer w10: SB55.1@4108.9,592.78 4104.24,597.43 cw(c4134.11,627.3) 4091.87,627.3 4091.87,929.34 cw(c4114.59,929.34) 4114.59,952.06 v1(4172.56,952.06)
NetJ16_2: J16.2 SB54.1 | length 450.7
  Top Layer w10: SB54.1@4112.71,517.21 4094.14,498.65 ccw(c4114.29,488.81) 4091.87,488.92 4091.87,382.69 ccw(c4104.56,382.69) 4104.56,370 v1(4124.9,370)
  Bottom Layer w15: v1@4125.17,370 4125.17,243.63 ccw(c4173.06,244.71) 4139.19,210.84 J16.2@4213.43,136.6
NetJ16_3: J16.3 SB53.1 | length 634.5
  Top Layer w12: SB53.1@4110.45,-7.18 4110.45,-508.03 ccw(c4205.62,-508.03) 4138.32,-575.32 v1(4180,-617)
NetJ16_4: J16.4 SB56.1 | length 45
  Top Layer w15: SB56.1@4179.32,469.23 v1(4224.35,469.23)
NetJ19_1: J19.1 SB65.1 | length 435.5
  Top Layer w10: SB65.1@2165.41,592.78 2160.76,597.43 cw(c2190.63,627.3) 2148.39,627.3 2148.39,929.34 cw(c2171.1,929.34) 2171.1,952.06 v1(2229.08,952.06)
NetJ19_2: J19.2 SB64.1 | length 450.7
  Top Layer w10: SB64.1@2169.23,517.21 2150.66,498.65 ccw(c2170.81,488.81) 2148.39,488.92 2148.39,382.69 ccw(c2161.08,382.69) 2161.08,370 v1(2181.41,370)
  Bottom Layer w15: v1@2181.68,370 2181.68,243.63 ccw(c2229.58,244.71) 2195.7,210.84 J19.2@2269.94,136.6
NetJ19_3: J19.3 SB63.1 | length 45
  Top Layer w15: SB63.1@2235.83,469.23 v1(2280.86,469.23)
NetJ22_1: J22.1 SB75.1 | length 435.5
  Top Layer w10: SB75.1@1065.63,592.78 1060.97,597.43 cw(c1090.84,627.3) 1048.6,627.3 1048.6,929.34 cw(c1071.32,929.34) 1071.32,952.06 v1(1129.3,952.06)
NetJ22_2: J22.2 SB74.1 | length 450.7
  Top Layer w10: SB74.1@1069.44,517.21 1050.88,498.65 ccw(c1071.03,488.81) 1048.6,488.92 1048.6,382.69 ccw(c1061.29,382.69) 1061.29,370 v1(1081.63,370)
  Bottom Layer w15: v1@1081.9,370 1081.9,243.63 ccw(c1129.8,244.71) 1095.92,210.84 J22.2@1170.16,136.6
NetJ22_3: J22.3 SB73.1 | length 45
  Top Layer w15: SB73.1@1136.05,469.23 v1(1181.08,469.23)
NetJ25_1: J25.1 SB85.1 | length 435.5
  Top Layer w10: SB85.1@496.65,592.78 492,597.43 cw(c521.87,627.3) 479.63,627.3 479.63,929.34 cw(c502.34,929.34) 502.34,952.06 v1(560.32,952.06)
NetJ25_2: J25.2 SB84.1 | length 450.7
  Top Layer w10: SB84.1@500.47,517.21 481.9,498.65 ccw(c502.05,488.81) 479.63,488.92 479.63,382.69 ccw(c492.32,382.69) 492.32,370 v1(512.65,370)
  Bottom Layer w15: v1@512.92,370 512.92,243.63 ccw(c560.82,244.71) 526.94,210.84 J25.2@601.18,136.6
NetJ25_3: J25.3 SB83.1 | length 45
  Top Layer w15: SB83.1@567.07,469.23 v1(612.1,469.23)
NetR1_1: R1.1 R2.1 R6.1 U2.2 | length 304.5
  Top Layer w10: R1.1@8614.16,414.11 8593.02,392.97 ccw(c8607.11,378.87) 8587.18,378.87 U2.2@8587.18,349.35 8587.18,247.87 ccw(c8603.91,247.87) 8603.91,231.14 R6.1@8664.35,231.14 ; R6.1@8668.35,231.14 R2.1@8668.35,267.19 R2.1@8673.52,267.19
NetR1_2: R1.2 R5.2 R7.2 U2.6 | length 516.4
  Top Layer w10: R5.2@8417.95,416.63 v1@8455.32,416.63 ; v1@8457.83,414.11 8478.98,392.97 cw(c8464.89,378.87) 8484.82,378.87 U2.6@8484.82,349.35
  Top Layer w15: R7.2@8668.35,377.15 8686.43,377.15 ; R7.2@8678.02,380.47 ccw(c8657.7,400.79) 8686.43,400.79 ; R7.2@8678.89,376.35 v1@8696.97,376.35 ; 8686.43,377.35 R1.2@8686.43,428.22 ; 8686.43,402.79 ccw(c8715.16,402.79) v1@8694.85,382.47
  Bottom Layer w12: v1(8456.95,415) 8456.95,398.05 ccw(c8477.65,398.05) 8477.65,377.35 v1(8699.97,377.35)
NetR2_2: R2.2 R7.1 U2.1 | length 84.5
  Top Layer w12: U2.1@8615.63,340.29 R7.1@8664.2,340.29 ; R2.2@8668.35,304.19 R7.1@8668.35,340.15
NetR3_2: R3.2 SB11.1 | length 182.7
  Top Layer w10: R3.2@8334.56,644.29 8334.56,766.03 cw(c8370.52,766.03) 8347.54,793.68 8360.52,804.47 SB11.1@8370.52,811.97
NetR4_1: R4.1 SB11.3 | length 47.7
  Top Layer w10: R4.1@8370.52,644.29 SB11.3@8370.52,691.97
NetR24_1: R24.1 R25.1 R29.1 U5.2 | length 304.5
  Top Layer w10: R24.1@7944.69,414.12 7923.54,392.97 ccw(c7937.64,378.88) 7917.71,378.88 U5.2@7917.71,349.35 7917.71,247.87 ccw(c7934.44,247.87) 7934.44,231.14 R29.1@7994.87,231.14 ; R29.1@7998.87,231.14 R25.1@7998.87,267.19 R25.1@8004.05,267.19
NetR24_2: R24.2 R28.2 R30.2 U5.6 | length 516.4
  Top Layer w10: R28.2@7748.47,416.63 v1@7785.85,416.63 ; v1@7788.36,414.12 7809.51,392.97 cw(c7795.41,378.88) 7815.34,378.88 U5.6@7815.34,349.35
  Top Layer w15: R30.2@7998.87,377.15 8016.96,377.15 ; R30.2@8008.54,380.47 ccw(c7988.23,400.79) 8016.96,400.79 ; R30.2@8009.41,376.35 v1@8027.5,376.35 ; 8016.96,377.35 R24.2@8016.96,428.23 ; 8016.96,402.79 ccw(c8045.69,402.79) v1@8025.37,382.47
  Bottom Layer w12: v1(7787.47,415) 7787.47,398.05 ccw(c7808.18,398.05) 7808.18,377.35 v1(8030.5,377.35)
NetR25_2: R25.2 R30.1 U5.1 | length 84.5
  Top Layer w12: U5.1@7946.16,340.29 R30.1@7994.73,340.29 ; R25.2@7998.87,304.19 R30.1@7998.87,340.15
NetR26_2: R26.2 SB21.1 | length 182.7
  Top Layer w10: R26.2@7665.09,644.3 7665.09,766.03 cw(c7701.04,766.03) 7678.06,793.68 7691.04,804.47 SB21.1@7701.04,811.97
NetR27_1: R27.1 SB21.3 | length 47.7
  Top Layer w10: R27.1@7701.04,644.3 SB21.3@7701.04,691.97
NetR37_1: R37.1 R38.2 R42.2 U6.2 | length 304.5
  Top Layer w10: R37.1@7207.94,414.11 7186.8,392.96 ccw(c7200.89,378.87) 7180.96,378.87 U6.2@7180.96,349.34 7180.96,247.87 ccw(c7197.69,247.87) 7197.69,231.14 R42.2@7258.12,231.14 ; R42.2@7262.12,231.14 R38.2@7262.12,267.18 R38.2@7267.3,267.18
NetR37_2: R37.2 R41.1 R43.1 U6.6 | length 516.4
  Top Layer w10: R41.1@7011.73,416.62 v1@7049.1,416.62 ; v1@7051.61,414.11 7072.76,392.96 cw(c7058.66,378.87) 7078.59,378.87 U6.6@7078.59,349.34
  Top Layer w15: R43.1@7262.12,377.14 7280.21,377.14 ; R43.1@7271.79,380.47 ccw(c7251.48,400.78) 7280.21,400.78 ; R43.1@7272.66,376.34 v1@7290.75,376.34 ; 7280.21,377.34 R37.2@7280.21,428.22 ; 7280.21,402.78 ccw(c7308.94,402.78) v1@7288.62,382.47
  Bottom Layer w12: v1(7050.73,414.99) 7050.73,398.05 ccw(c7071.43,398.05) 7071.43,377.34 v1(7293.75,377.34)
NetR38_1: R38.1 R43.2 U6.1 | length 84.5
  Top Layer w12: U6.1@7209.41,340.29 R43.2@7257.98,340.29 ; R38.1@7262.12,304.18 R43.2@7262.12,340.14
NetR39_2: R39.2 SB31.1 | length 182.7
  Top Layer w10: R39.2@6928.34,644.29 6928.34,766.02 cw(c6964.29,766.02) 6941.31,793.68 6954.29,804.46 SB31.1@6964.29,811.96
NetR40_1: R40.1 SB31.3 | length 47.7
  Top Layer w10: R40.1@6964.29,644.29 SB31.3@6964.29,691.96
NetR50_1: R50.1 R51.1 R55.1 U7.2 | length 304.5
  Top Layer w10: R50.1@6395.23,414.12 6374.08,392.97 ccw(c6388.18,378.87) 6368.24,378.87 U7.2@6368.24,349.35 6368.24,247.87 ccw(c6384.98,247.87) 6384.98,231.14 R55.1@6445.41,231.14 ; R55.1@6449.41,231.14 R51.1@6449.41,267.19 R51.1@6454.59,267.19
NetR50_2: R50.2 R54.2 R56.2 U7.6 | length 516.4
  Top Layer w10: R54.2@6199.01,416.63 v1@6236.39,416.63 ; v1@6238.9,414.12 6260.04,392.97 cw(c6245.95,378.87) 6265.88,378.87 U7.6@6265.88,349.35
  Top Layer w15: R56.2@6449.41,377.15 6467.49,377.15 ; R56.2@6459.08,380.47 ccw(c6438.77,400.79) 6467.49,400.79 ; R56.2@6459.95,376.35 v1@6478.03,376.35 ; 6467.49,377.35 R50.2@6467.49,428.23 ; 6467.49,402.79 ccw(c6496.22,402.79) v1@6475.91,382.47
  Bottom Layer w12: v1(6238.01,415) 6238.01,398.05 ccw(c6258.72,398.05) 6258.72,377.35 v1(6481.03,377.35)
NetR51_2: R51.2 R56.1 U7.1 | length 84.5
  Top Layer w12: U7.1@6396.69,340.29 R56.1@6445.26,340.29 ; R51.2@6449.41,304.19 R56.1@6449.41,340.15
NetR52_2: R52.2 SB41.1 | length 182.7
  Top Layer w10: R52.2@6115.62,644.29 6115.62,766.03 cw(c6151.58,766.03) 6128.6,793.68 6141.58,804.47 SB41.1@6151.58,811.97